# Altium PCB VA_NodeV1.2.PcbDoc (part 4 of 4)
Units mil, origin at the board's own origin, x right, y up, seen from the top; angles counter-clockwise.
Board outline 2925 x 2390 mil, 2 copper layers (Top Layer, Bottom Layer), stack 57 mil thick; 152 components, 110 nets, 488 pads, 205 vias.
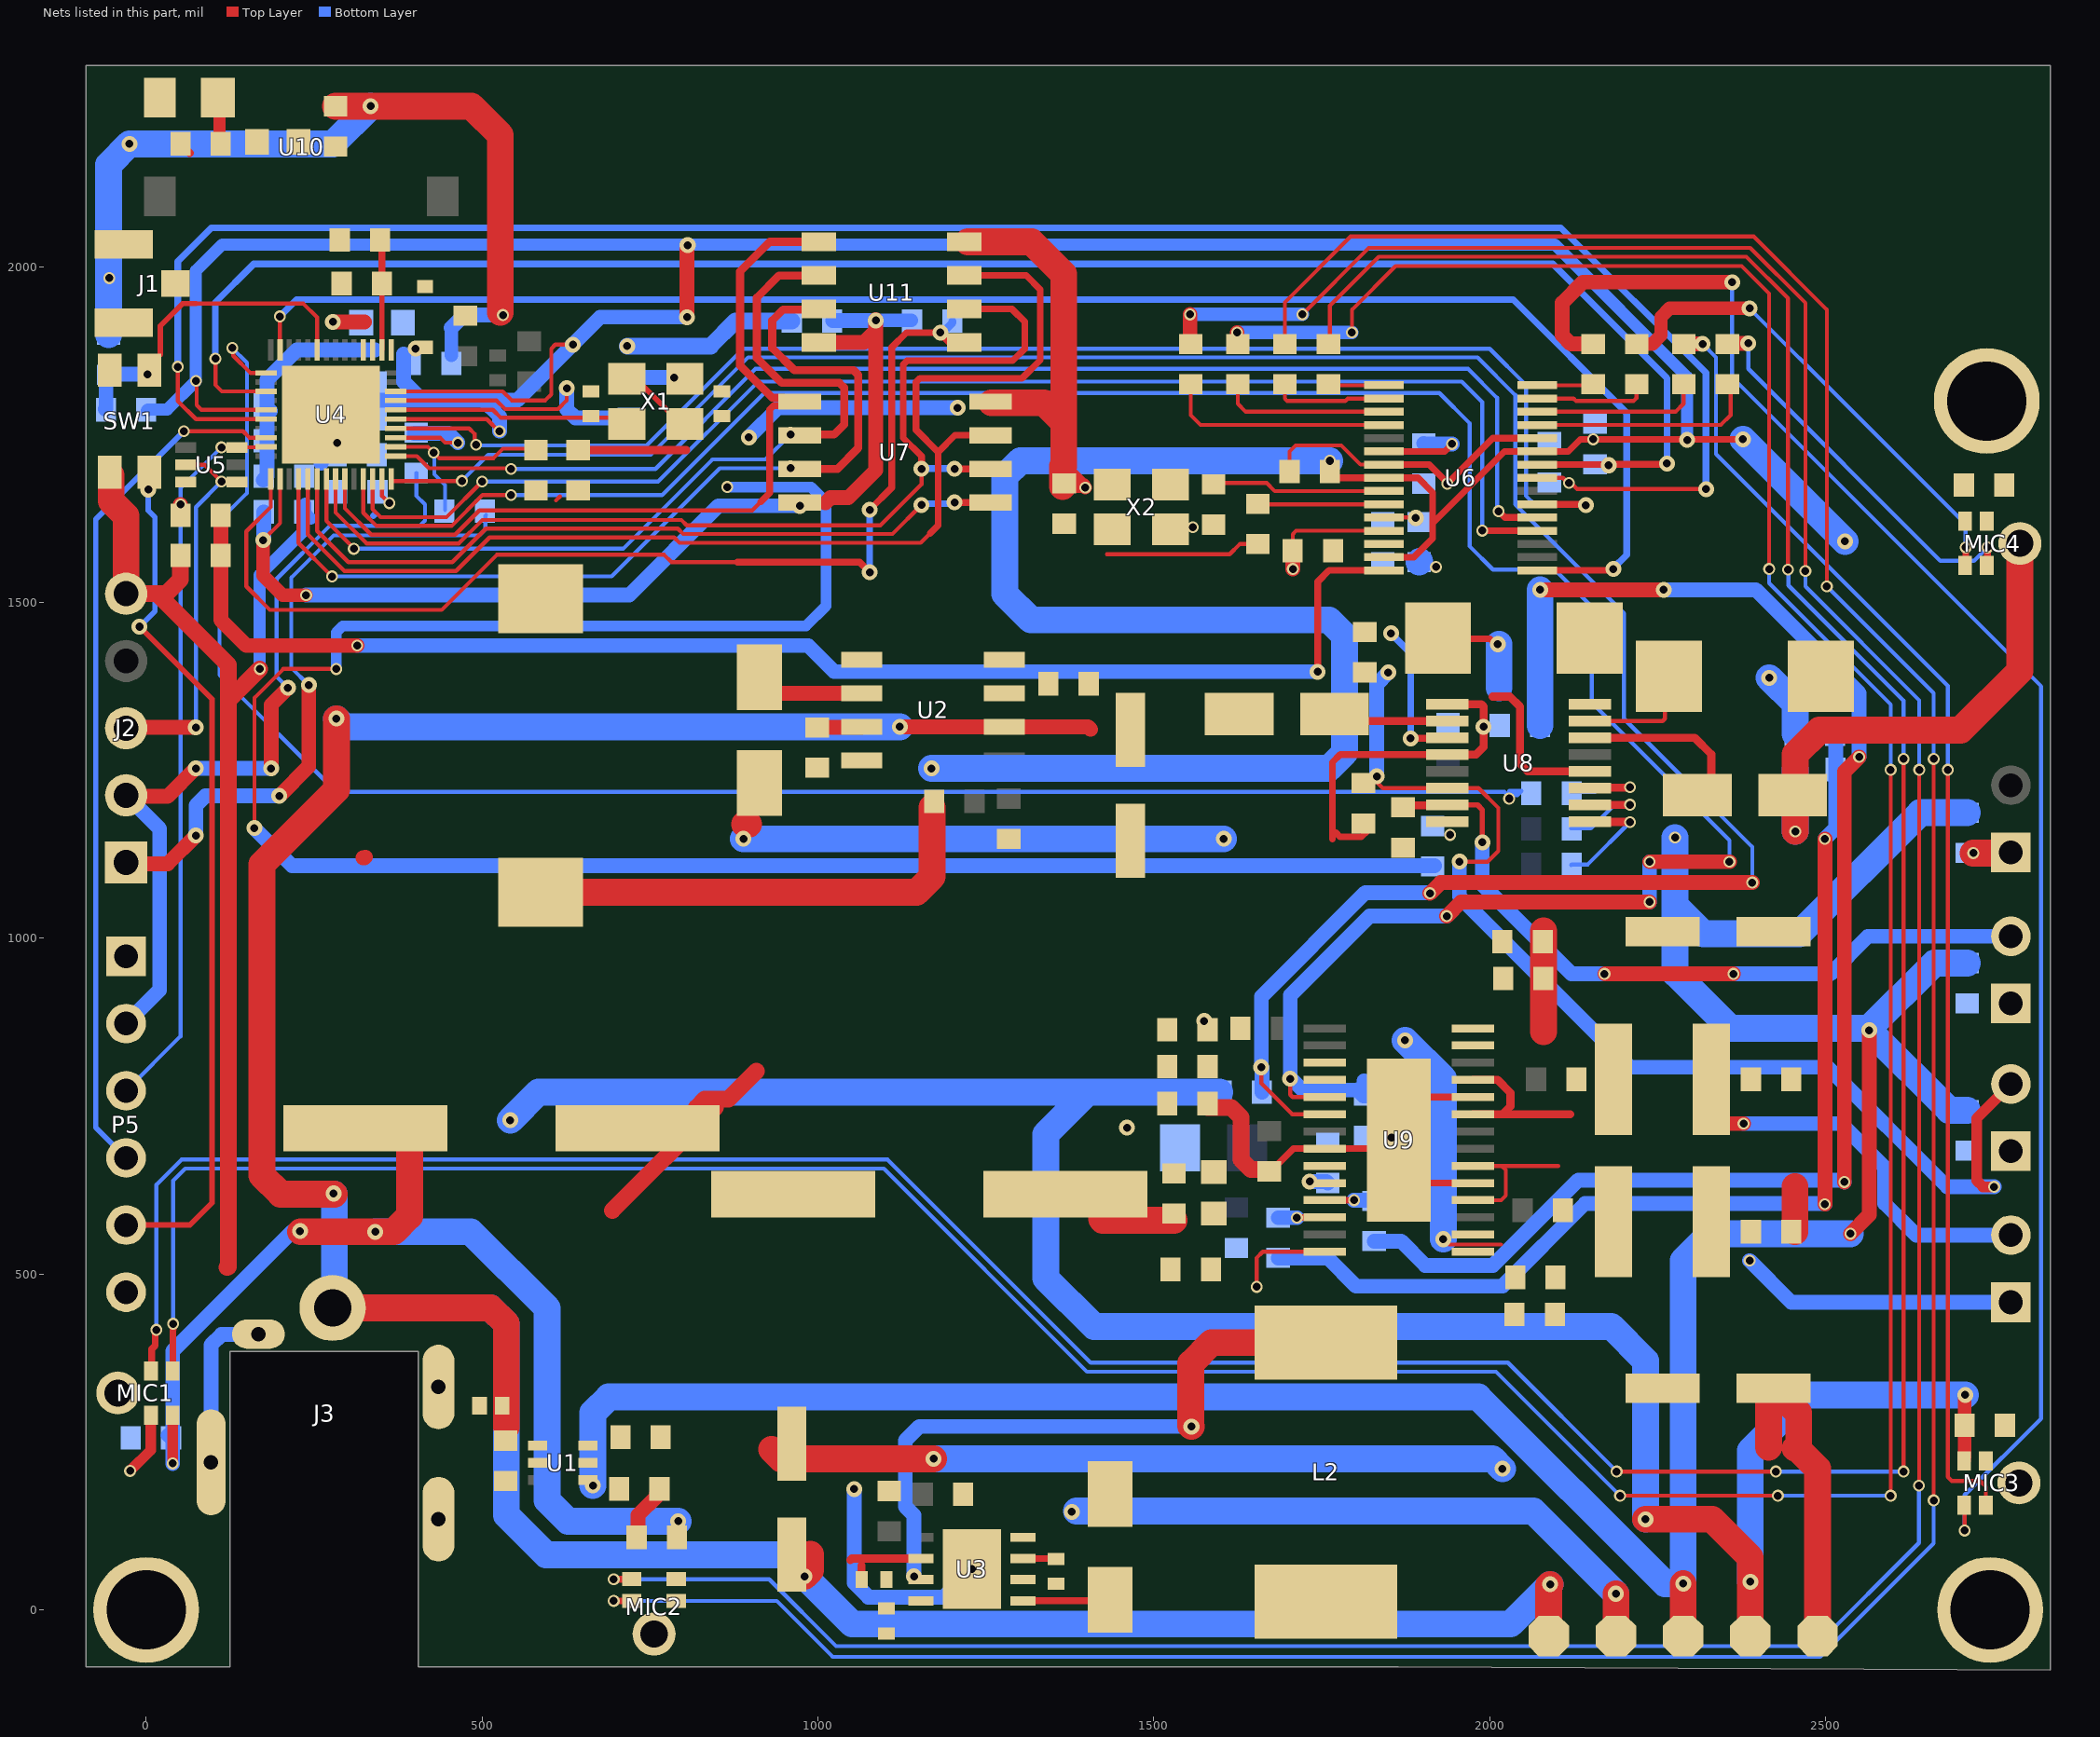
[diagram p2: the nets of this part, all layers, seen from the top]

## Via types
v1: diameter 23.62, hole 11.81, Top Layer to Bottom Layer, tented both sides, 93 vias
v2: diameter 17.72, hole 11.81, Top Layer to Bottom Layer, tented both sides, 81 vias
v3: diameter 17.72, hole 11.81, Top Layer to Bottom Layer, 20 vias
v4: diameter 23.62, hole 11.81, Top Layer to Bottom Layer, 11 vias

## Nets (pads, with @x,y where several pads share a name; then routed paths per layer and width w, separated by ;. In a path a pad name is that pad's centre, name@x,y a point inside that pad or via, vN(x,y) a via of type N, cw(c..) or ccw(c..) an arc to the next point about the centre after c; other vN are vias at no path point) (continued)
ENABLE: C37.1 P5.5 R10.1 SW1.1 U4.9 U5.6 | length 1741.7
  Top Layer w6: SW1.1@4.53,1845.79 4.53,1852.68 SW1.1@21,1869.15 ; 74,1945 85,1945 234,1945 254.33,1924.67 U4.9@254.33,1876.26
  Top Layer w8: P5.5@-30,573 65,573 98,606 98,1356 v1(-10,1464) ; SW1.1@21,1869.15 21,1912 54,1945 74,1945
  Bottom Layer w8: v1(-10,1464) 13,1487 13,1627 3,1637 v1(3,1668)
  Bottom Layer w22: R10.1@-61,1788 -59.94,1789.06 -59.94,1836.06 C37.1@-57,1839 ; C37.1@-48.11,1840 v1(2,1840)
FEED: SB2.1 SB3.1 U4.2 | length 171.7
  Top Layer w8: U4.2@350.79,1876.26 SB2.1@350.79,1975
  Top Layer w10: SB2.1@350.79,1975 SB3.1@350.79,2048
FEED#: C47.1 L6.2 SB3.2
FMT: P2.2 R17.1 U8.15 | length 1098.9
  Top Layer w6: U8.15@1936.29,1198 U8.15@1936.79,1198.5
  Top Layer w8: U8.15@1936.79,1198.5 1981.97,1198.5 1989,1191.47 v1(1989,1143)
  Top Layer w12: R17.1@1869,1198 U8.15@1936.29,1198
  Top Layer w22: v3@2172,947 v3(2363,947)
  Bottom Layer w22: v1(1989,1143) 1989,1080 2122,947 v3(2171,947) ; v3(2363,947) 2507,947 2563,1003 P2.2@2776,1003
GAIN0: R21.1 U4.35 U9.5 | length 3785.5
  Top Layer w6: U4.35@323.23,1683.74 323.23,1633.77 343,1614 454.55,1614 500.55,1660 v2(543,1660) ; v1(1703,791) 1703,767.06 1706.51,763.54 U9.5@1754.53,763.54
  Top Layer w22: v2(1936,1033) 1957,1054 v2(2238,1054) ; v2(2238,1114) v2(2357,1114)
  Bottom Layer w6: v2(543,1660) 768,1660 920,1812 1925,1812 1970,1767 1970,1584 2005,1549 2097,1549 2152,1494 2152,1351 2357,1146 v2(2357,1114)
  Bottom Layer w22: R21.1@1808.5,774.92 1808.5,769 1812.5,765 R21.1@1815,765 ; 1813,787.81 1813,782 1805,774 1721.44,774 1704.75,790.69 1703.31,790.69 v1(1703,791) 1703,915 1821,1033 v2(1936,1033) ; v2(2238,1054) v2(2238,1114)
GAIN1: R22.1 U4.38 U9.6 | length 3727.7
  Top Layer w6: U4.38@364.57,1683.74 364.57,1681.94 365.5,1681 v2(470,1681) ; v1(1660,808) 1660,784 1706.05,737.95 U9.6@1754.53,737.95
  Top Layer w22: v2(1911,1067) 1927,1083 v3(2391,1083)
  Bottom Layer w6: v2(470,1681) 509,1720 751,1720 896,1865 1982,1865 2038,1809 2038,1646 2200,1484 2200,1327 2391,1136 v3(2391,1083)
  Bottom Layer w22: v1(1660,808) 1660,913.01 1814.99,1068 v2@1911,1068 ; R22.1@1661,771 v1@1661,807
GND: C1.2 C2.2 C3.2 C4.2 C5.1 C6.2 C7.2 C8.1 C9.2 C10.2 C11.2 C12.2 C13.2 C14.1 C15.1 C16.2 C17.2 C18.2 C19.2 C21.2 C22.2 C23.2 C32.1 C33.1 C34.1 C35.1 C36.2 C37.2 C39.2 C40.2 C43.1 C44.1 C45.1 C46.1 C47.2 C48.2 C49.2 C50.2 C51.2 C52.2 C53.2 C54.2 C55.2 C56.2 C57.2 C58.2 C59.2 C61.2 C62.2 C65.2 C66.2 D1.2 D3.2 D4.2 J1.2 J1.3 J2.5 J3.2 J3.3 J3.4 J3.5 MIC1.3 MIC1.4 MIC2.3 MIC2.4 MIC3.3 MIC3.4 MIC4.3 MIC4.4 P5.6 P10.1 pad.MH1 pad.MH2 pad.MH3 R1.1 R4.1 R8.1 R15.2 R16.2 R17.2 R21.2 R34.1 SB8.2 SB9.2 SW1.2 U1.2 U1.5 U2.4 U3.2 U3.4 U3.9 U4.49 U6.7 U6.12 U6.26 U7.4 U8.4 U8.9 U8.12 U9.3 U9.4 U9.8 U9.19 U9.24 U9.29 U10.1 U11.4 X1.2 X1.4 X2.2 X2.4 | length 11004.1
  Top Layer w6: X1.2@715.39,1832.93 cw(c715.39,1799.89) X1.2@738.75,1823.25 ; X1.4@791.77,1770.23 ccw(c802,1780.49) X1.4@802,1766 ; C22.2@1702,1695 1702,1725 1711,1734 1779,1734 1807.64,1705.36 1842.62,1705.36 U6.7@1842.66,1705.31 ; C23.2@1706.83,1577 1706.83,1601.83 1711.89,1606.89 U6.12@1842.66,1606.89 ; R16.2@1814.49,1174.49 R16.2@1815,1175 ; v2(1937,1677) v2@1937.63,1677.63
  Top Layer w8: X1.2@738.75,1823.25 X1.4@791.76,1770.24
  Top Layer w10: C66.2@1672,653 1674.5,653 1684.5,663 1684.5,663.24 1708.03,686.77 U9.8@1754.53,686.77 U9.29@1851.97,686.77 ; 1766,1147.86 1766,1262 1777.5,1273.5 U8.12@1936.79,1273.5 ; 1771,1156.86 1776.86,1151 1809,1151 R16.2@1818.5,1160.5 ; U6.7@1842.66,1705.31 1909.95,1705.31 1937.63,1677.63 2004.68,1744.68 U6.26@2071,1744.68 ; U9.29@1864.76,699.57 1864.76,677.83 1907.01,635.59 U9.19@1975,635.59 ; U9.29@1864.76,703 1864.76,721.3 1907.01,763.54 U9.24@1975,763.54
  Top Layer w12: C46.1@51,2183 C46.1@64.61,2169.39 ; SB9.2@643,1727 804,1727 ; U8.12@1936.79,1273.5 1979.5,1273.5 1991,1285 v1(1991,1315) 1991,1345 1987.5,1348.5 U8.9@1936.79,1348.5 ; 2004,1360 2030,1360 2045,1345 2045,1260 2056.5,1248.5 U8.4@2149.39,1248.5
  Top Layer w16: v3(-24,207) 7,238 MIC1.4@7,290
  Top Layer w20: 1366,1703 1395,1674 v2(1398,1671)
  Top Layer w22: v2@527,1932 v2(531,1928) ; C49.2@730,108 732.08,110.08 732.08,141.08 760,169 760,173.5 760.31,173.81 C2.2@762.81,173.81 ; C33.1@1369.93,1674 v2@1395,1674 ; C23.2@1706.83,1577 1707,1576.83 v2(1707,1550)
  Top Layer w25: J2.5@-30,1513 16,1513 ; SB8.2@51,1570 51,1534 30,1513 16,1513 ; 120,510 121,510 122,511 122,1354 ; v2(169,1401) 122,1354 ; 694.14,595 C4.2@847.2,748.05 ; C4.2@819.2,748.05 831.47,760.33 866.83,760.33 908.5,802 ; C54.2@1580,748 1582.32,748 1582.5,747.82 1615.36,747.82 1630,733.18 1630,670.14 1644.64,655.5 1669.5,655.5 C66.2@1672,653 ; 16,1513 122,1407 122,1354
  Top Layer w40: SW1.2@-52.24,1689.61 -52.24,1651.24 -30,1629 J2.5@-30,1513 ; C47.2@282,2239 484,2239 527,2196 v2@527,1932 ; 891,1170 897,1170 ; 931,239 945,225 v1(1172,225) ; U11.4@1223.34,2037 1318,2037 1366,1989 1366,1770 1366,1703 ; U7.4@1258.4,1797.4 1336.6,1797.4 1364,1770 ; C33.1@1364,1672.83 1364,1703 ; U9.29@1838,672.8 1851.97,686.77 U9.29@1864.76,699.57 ; 2415.5,242 C57.2@2415.5,331.5 ; C57.2@2422.68,330 2459,293.68 ; C43.1@2454.5,563 2454.5,630.5 ; 2455,240.5 2458.14,240.5 2488,210.64 P10.1@2488,-39 ; v2(2455,1159) 2455,1274 2491,1310 2701,1310 2789.29,1398.29 MIC4.3@2789.29,1587.97 ; 2460,240.5 2460,293.68
  Bottom Layer w18: v2(169,1401) 169,1541 234,1606 234,1623 235,1624 C19.2@235,1635 C19.2@245,1625 ; C19.2@237,1635 C19.2@237,1647 ; C9.2@283.23,1723.81 C9.2@284,1723.04
  Bottom Layer w20: C12.2@454,1868 454,1909
  Bottom Layer w22: J3.2@96.42,219.65 96.42,394.42 111.96,409.96 J3.3@166.38,409.96 ; 260.25,1707.25 260.25,1717.25 C9.2@278.5,1735.5 ; C9.2@283.5,1735.5 286,1733 286,1736 v1(284,1738) ; 454,1909 473,1928 v2(531,1928) ; v4(897,1746) 941,1790 v4(1208,1790) ; v1(1054,180) 1054,40 1075,19 1187.46,19 v1(1229.21,60.75)
  Bottom Layer w25: v1(716,1882) 840,1882 877,1919 R34.1@961,1919
  Bottom Layer w40: C37.2@-56,1899 v2@-56,1981 ; v2@-56,1983 -56,2152 v1(-25,2183) 278,2183 v1(334,2239) ; J3.3@166.38,409.96 J3.3@167.01,410.59 ; v1(889,1148) v1(1604,1148) ; v1(1172,225) 2004,225 v1(2019,210) ; C35.1@1895,1560 C35.1@1896,1561 ; v2(2455,1159) C61.2@2455,1251.5
  other v1: 1854,703 1575,877
  other v2: 1920,1553 1558,1612 -55,1983
GPIO16: R35.2 U4.25 U11.1 | length 1658.1
  Top Layer w6: U4.25@185.43,1683.74 185.43,1642.43 149,1606 149,1524 184,1489 439.86,1489 521.86,1571 771,1571 782,1560 880,1560
  Top Layer w10: 880,1560 1062,1560 v1(1077,1545) ; v1(1077,1638) 1110,1671 1110,1880.05 1131.81,1901.86 v1(1182.22,1901.86)
  Top Layer w12: v1(1182.22,1901.86) 1197.08,1887 U11.1@1215.78,1887
  Bottom Layer w10: v1(1077,1545) v1(1077,1638)
  Bottom Layer w12: v1(1182.22,1901.86) 1185.36,1901.86 1200,1916.5 R35.2@1200,1919
INTA: U4.42 U6.21 | length 2117.2
  Top Layer w6: U4.42@371.26,1759.33 480.67,1759.33 488.76,1751.24 488.76,1737.24 v2(491,1735)
  Top Layer w10: U6.21@2071,1646.26 v1@2145,1646.26
  Bottom Layer w6: v2(491,1735) 492,1734 745,1734 889,1878 2000,1878 2054,1824 2054,1659 2068,1645 v1(2143,1645)
INTB: U4.39 U6.20 | length 1958.4
  Top Layer w6: U4.39@371.26,1717.99 402.93,1717.99 420.93,1700 v2@541,1700 ; U6.20@2070.91,1626.48 U6.20@2071,1626.57
  Top Layer w10: v2(2013.09,1636) 2022.51,1626.57 2070.81,1626.57 U6.20@2070.91,1626.48
  Bottom Layer w6: v2@541,1699 758,1699 907,1848 1967.81,1848 2011,1804.81 2011,1638.09 v2(2013.09,1636)
  other v2: 543,1699
INTC: U4.36 U6.19 | length 2071.6
  Top Layer w6: U4.36@337.01,1683.74 337.01,1641.01 336.98,1639.02 349,1627 447,1627 v2(500,1680)
  Top Layer w10: v2(1989,1607) 1989.06,1606.94 2070.95,1606.94 U6.19@2071,1606.89
  Bottom Layer w6: v2(500,1680) 762,1680 911,1829 1958.53,1829 1989,1798.53 v2(1989,1607)
IO_0: P5.3 SB7.2 U4.23 U5.3 | length 1100.2
  Top Layer w6: v2(112,1731) 112.2,1730.8 137.98,1730.8 138.19,1730.59 138.78,1731.18 178.15,1731.18 U4.23@178.74,1731.77
  Top Layer w22: SB7.2@51,1630 v2(51,1646)
  Bottom Layer w6: P5.3@-30,773 51,854 51,1670 v2(112,1731)
IO_2: P5.4 U4.22 | length 1281.6
  Top Layer w6: v2(56,1755) 144,1755 153.45,1745.55 U4.22@178.74,1745.55
  Bottom Layer w8: P5.4@-30,673 -75,718 -75,1624 v2(56,1755)
"IPK SNS": R2.1 U2.1 U2.7 U2.8
"IPK SNS#": L2.2 R5.1 R7.1 U3.7 | length 944.4
  Top Layer w40: v1(1556,273) 1555,274 1555,367 1585.91,397.91 L2.2@1750,397.91
  Bottom Layer w22: v1(1143,50) 1143,140.72 1130,153.72 1130,252.11 1150.89,273 v1(1556,273)
LRCK_DAC: R25.2 U4.15 | length 2631.1
  Top Layer w6: v2(128,1879) 129.63,1877.37 129.63,1867.37 154.99,1842.01 U4.15@178.74,1842.01
  Bottom Layer w6: v2(128,1879) 150,1857 150,1663 109,1622 109,1392 283,1218 2022,1218 v2@2029,1211 ; v2(2029,1208) v2@2029,1211 ; v2@2029,1211 v2@2029,1213 ; v2@2029,1213 2041.38,1213 2047.63,1219.25 2029,1219.25 v2@2029,1213
LRCKA: U4.13 U6.16 | length 2489.3
  Top Layer w6: v2(199,1926) 199.11,1925.89 199.11,1876.37 U4.13@199.15,1876.32
  Top Layer w10: U6.16@2071,1547.83 2181.83,1547.83 v1(2184,1550)
  Bottom Layer w10: v2(199,1926) 224,1951 2035,1951 2204,1782 2204,1570.99 2184,1550.99 v1(2184,1550)
MUTE: P3.2 R16.1 SB1.1 U8.14 | length 1741.1
  Top Layer w6: R16.1@1810,1235 R16.1@1811,1236 ; R16.1@1811,1227 R16.1@1816.25,1232.25 ; R16.1@1816,1232.5 1818.5,1235 1832,1235 v1(1832,1241) ; v1@1832,1232.5 1841,1223.5 U8.14@1936.79,1223.5 1983.5,1223.5 2013,1194 2013,1130 1997,1114 v1(1955,1114)
  Top Layer w16: v3(2751,630) 2734.37,630 2725,639.37 2725,732 P3.2@2776,783
  Bottom Layer w22: v1(1832,1241) 1832,1378.56 1849,1395.56 v1(1849,1396) ; v1(1955,1114) 1955,1062 2209,808 2503,808 2681,630 v3(2751,630)
NetC5_2: C5.2 U2.3 | length 67.2
  Top Layer w22: C5.2@999,1312 1001.19,1314.19 1064.19,1314.19 U2.3@1065,1315
NetC8_2: C8.2 U3.3 | length 50.6
  Top Layer w6: C8.2@1353.5,76.5 C8.2@1355,75
  Top Layer w10: U3.3@1305,76.5 C8.2@1353.5,76.5
NetC24_2: C24.2 U6.1 | length 83.3
  Top Layer w6: C24.2@1760,1825 1761.58,1823.42 U6.1@1842.66,1823.42
NetC25_2: C25.2 U6.2 | length 172.1
  Top Layer w6: C25.2@1695,1825 1695,1803.51 1698.51,1800 1785,1800 1788.74,1803.74 U6.2@1842.66,1803.74
NetC26_2: C26.2 U6.3 | length 251.6
  Top Layer w6: C26.2@1625,1825 1625,1796 1636.95,1784.05 U6.3@1842.66,1784.05
NetC27_2: C27.2 U6.4 | length 339.7
  Top Layer w6: C27.2@1555,1825 1555,1779 1569.63,1764.37 U6.4@1842.66,1764.37
NetC28_2: C28.2 U6.27 | length 339.7
  Top Layer w6: U6.27@2071,1764.37 2344.03,1764.37 2358.66,1779 C28.2@2358.66,1825
NetC29_2: C29.2 U6.28 | length 251.6
  Top Layer w6: U6.28@2071,1784.05 2276.71,1784.05 2288.66,1796 C29.2@2288.66,1825
NetC30_2: C30.2 U6.29 | length 171.5
  Top Layer w6: U6.29@2071,1803.74 2124.92,1803.74 2128.66,1800 2214,1800 2218.51,1804.51 2218.51,1824.85 C30.2@2218.66,1825
NetC31_2: C31.2 U6.30 | length 83.3
  Top Layer w6: U6.30@2071,1823.42 2152.08,1823.42 C31.2@2153.66,1825
NetC32_2: C32.2 C35.2 U6.11 | length 47.6
  Top Layer w6: U6.11@1842.66,1626.57 1889.43,1626.57 v1(1890,1626)
NetC33_2: C33.2 R13.1 X2.1 | length 231.2
  Top Layer w6: 1430,1572 1613,1572 1628,1587 R13.1@1655,1587
NetC36_1: C36.1 U6.6 | length 148.3
  Top Layer w10: U6.6@1842.66,1725 1933,1725 v2(1944,1736)
  Bottom Layer w22: C36.1@1902,1737 1903,1736 v2(1944,1736)
NetC38_2: C38.2 U8.7 | length 171.1
  Top Layer w6: U8.7@2149.39,1323.5 2257.49,1323.5 2261,1327.01 C38.2@2261,1385
NetC40_1: C40.1 U8.10 | length 172
  Top Layer w6: C40.1@1741.87,1334 C40.1@1744.37,1331.5
  Top Layer w12: C40.1@1768.37,1323.5 U8.10@1936.79,1323.5
NetC46_2: C46.2 L6.1 U10.2 | length 69.2
  Top Layer w18: U10.2@108.81,2243.91 108.81,2185.19 C46.2@111,2183 ; U10.2@108.81,2249.81 U10.2@114,2255
NetC60_2: C60.2 U8.8 | length 5.9
  Top Layer w10: C60.2@2105,1444 C60.2@2109.18,1439.82
NetC63_2: C63.2 U9.11 | length 73.9
  Top Layer w10: U9.11@1754.53,610 v2(1798,610)
  Bottom Layer w22: v2(1798,610) 1827,610 C63.2@1828,609
NetC64_2: C64.2 U9.12 | length 69.7
  Top Layer w6: v2(1713,584) v2@1713.41,584.41
  Top Layer w10: v2@1713.41,584.41 U9.12@1754.53,584.41
  Bottom Layer w22: C64.2@1685,584 v2(1713,584)
NetD1_1: D1.1 L1.1 U2.2 | length 174.8
  Top Layer w22: D1.1@900,1388.74 923.74,1365 U2.2@1065,1365
NetD2_2: D2.2 L2.1 U3.1 | length 130.6
  Top Layer w6: D2.2@1433.5,13.5 D2.2@1435,15
  Top Layer w10: U3.1@1305,13.5 D2.2@1433.5,13.5
NetJ1_1: J1.1 SB2.2
NetL7_1: L7.1 SB5.2
NetP1_1: P1.1 R14.1 | length 56.4
  Top Layer w40: v2(2720,1127) 2775,1127 P1.1@2776,1128
NetP2_1: P2.1 R18.1
NetP3_1: P3.1 R19.1
NetR5_2: R5.2 U3.8
NetR9_2: R9.2 U4.45 | length 412.8
  Top Layer w6: U4.45@371.26,1800.67 521.67,1800.67 534.34,1788 613,1788 626,1801 v1(626,1819)
  Bottom Layer w22: v1(626,1819) 626,1787.89 638.89,1775 R9.2@719,1775
NetR11_2: R11.2 U4.41 | length 166.7
  Top Layer w6: U4.41@371.26,1745.55 437.45,1745.55 445,1738 v2(464,1738)
  Bottom Layer w22: R11.2@399,1752 450,1752 v2(464,1738)
NetR23_1: R23.1 U8.1 | length 175.3
  Top Layer w12: U8.1@2149.39,1173.5 2149.64,1173.25 2209.75,1173.25 v2@2210,1173
  Bottom Layer w6: R23.1@2121,1109 R23.1@2122,1110 2145.99,1109.99 v2(2209,1173)
NetR24_1: R24.1 U8.2 | length 164.4
  Top Layer w6: U8.2@2149.39,1198.5 U8.2@2149.64,1198.25
  Top Layer w12: U8.2@2149.64,1198.25 2150.07,1198.69 2209.69,1198.69 v2@2209.88,1198.88
  Bottom Layer w6: R24.1@2121,1163.5 2150.5,1163.5 2185.88,1198.88 v2@2209.88,1198.88
  other v2: 2209,1198.88
NetR25_1: R25.1 U8.3 | length 151.3
  Top Layer w6: U8.3@2149.39,1223.5 U8.3@2149.64,1223.25
  Top Layer w12: U8.3@2149.64,1223.25 2150.64,1224.25 2208.25,1224.25 v2(2209,1225)
  Bottom Layer w6: R25.1@2121,1218 2157,1218 2164,1225 v2(2209,1225)
NetR26_1: R26.1 U8.16
  other v2: 1941,1154
NetR30_1: R30.1 U9.14 | length 148.3
  Top Layer w6: v2(1653,481) 1653,524 1662.23,533.23 U9.14@1754.53,533.23
NetR31_2: R31.2 SB6.1 U4.40 | length 311.9
  Top Layer w6: U4.40@371.26,1731.77 419.23,1731.77 v2(428,1723) 436,1715 517,1715 531,1729 578,1729 SB6.1@580,1727
  Bottom Layer w6: v2@429,1721 429,1691 445,1675 R31.2@445,1638
OUT1_N: C24.1 MIC1.2 | length 5702.4
  Top Layer w6: C24.1@1762.08,1885 1762.08,1942.08 1835,2015 2382,2015 2444,1953 v2(2444,1549) ; v3(2189,206) v3(2426,206) ; v3(2616,206) v3@2616,1266
  Top Layer w10: MIC1.2@7,355.94 8,356.94 8,388.14 13.52,393.66 13.52,415.52 v2(15,417)
  Bottom Layer w6: v2(15,417) 15,633 52.43,670.43 1103.56,670.43 1406,368 2027,368 v3(2189,206) ; v3(2426,206) v3(2616,206) ; v2(2444,1549) 2444.67,1548.33 2444.67,1525.33 2616,1354 v3@2616,1266
  other v3: 2616,1267
OUT1_P: C26.1 MIC1.1 | length 5793.8
  Top Layer w6: v2(1795,1902) 1795,1936 1860,2001 2375,2001 2416,1960 v2(2416,1550) ; v3(2194,170) v3(2429,170) ; v3(2597,170) v3@2597,1248
  Top Layer w10: MIC1.1@39.36,355.94 39.68,356.26 39.68,417.68 v2@40,418
  Top Layer w22: v2(1624,1902) 1624,1886 C26.1@1625,1885
  Bottom Layer w6: v2(40,426) 40,639 58,657 1098,657 1400.44,354.57 2009.44,354.57 v3(2194,170) ; v2(2416,1550) 2416,1529 2597,1348 v3(2597,1251) v3@2597,1248 ; v3(2429,170) v3(2597,170)
  Bottom Layer w20: v2(1624,1902) v2(1795,1902)
OUT2_N: C25.1 MIC2.2 | length 4953.3
  Top Layer w6: C25.1@1695,1885 1695,1947 1793,2045 2393,2045 2502,1936 v2(2502,1524) ; v3(2661,163) v3@2661,1266
  Top Layer w10: v2(696.03,13.29) MIC2.2@723.03,13.29
  Top Layer w22: C25.1@1698.58,1883.42 C25.1@1700.15,1885
  Bottom Layer w6: v2(696.03,13.29) 938.71,13.29 1022,-70 2492,-70 2661,99 v3(2661,163) ; v2(2502,1524) 2661,1365 v3@2661,1269
  other v3: 2661,1267
OUT2_P: C27.1 MIC2.1 | length 5027.1
  Top Layer w6: v2(1721,1929) 1820,2028 2388,2028 2470,1946 v2(2470,1547) ; v3(2639,185) 2639.5,185.5 v3@2639.5,1248
  Top Layer w10: v2(696.03,45.65) MIC2.1@723.03,45.65
  Top Layer w22: v2(1554,1929) 1554,1886 C27.1@1555,1885
  Bottom Layer w6: v2(696.03,45.65) 927.35,45.65 1027,-54 2485.37,-54 2639,99.63 v3(2639,185) ; v2(2470,1547) 2470,1524 2639.5,1354.5 v3@2639.5,1248
  Bottom Layer w20: v2(1554,1929) v2(1721,1929)
  other v3: 2639.5,1251
OUT3_N: C29.1 MIC3.2 | length 1954.3
  Top Layer w6: v3(2682,1251) 2682,198 2688,192 2730,192 2738.71,183.29 MIC3.2@2738.71,156.03
  Top Layer w22: C29.1@2291,1885 v1(2317,1885)
  Bottom Layer w6: v1(2317,1885) 2337,1865 2337,1721 2682,1376 v3(2682,1251)
OUT3_P: C31.1 MIC3.1 | length 2499.9
  Top Layer w6: MIC3.1@2706.35,156.03 2707,155.37 v3(2707,118.2)
  Top Layer w22: C31.1@2154,1885 2120.89,1885 2108,1897.89 2108,1946 2139,1977 v1(2361,1977)
  Bottom Layer w6: v1(2361,1977) 2361,1835 2821,1375 2821,285 2707,171 v3(2707,118.2)
OUT4_N: C28.1 MIC4.2 | length 579.2
  Top Layer w10: MIC4.2@2741,1555 v2(2741,1582)
  Top Layer w22: C28.1@2354,1885 2355,1886 v1(2385,1886)
  Bottom Layer w6: v1(2385,1886) 2385,1848 2671,1562 2721,1562 v2(2741,1582)
OUT4_P: C30.1 MIC4.1 | length 722.1
  Top Layer w10: MIC4.1@2708.64,1555 v2(2708.64,1582)
  Top Layer w20: C30.1@2219,1885 2242.11,1885 2255,1897.89 2255,1925.11 2267.89,1938 v1(2387,1938)
  Bottom Layer w6: v1(2387,1938) 2534,1791 2708.64,1616.36 v2(2708.64,1582)
OUT_EN: R1.2 U1.3
OUTN: C42.1 L5.1 U9.23 U9.25 | length 247.3
  Top Layer w6: 2114.05,737.95 2115,737
  Top Layer w12: U9.23@1975,737.95 2019.02,737.95 ; U9.25@1975,789.13 2011.87,789.13 2031,770 2031,750 2019.02,738.02 2019.02,737.95 ; 2120.05,737.95 2019.02,737.95
OUTP: C41.1 L4.1 U9.18 U9.20 | length 225.5
  Top Layer w6: U9.18@1975,610 2017,610 2024,617 2024,655 2018,661 ; U9.20@1975,661.18 1975.18,661 2018,661 ; 2102,661 2018,661
PLIMIT: C44.2 U9.9 U9.10 | length 28
  Bottom Layer w22: v1(1732,638) 1732.31,637.69 1756.9,637.69 C44.2@1759,635.59
RTS: J2.3 U5.1 U5.5 | length 571.7
  Top Layer w6: U5.5@61.81,1705 87,1705 v2(111.96,1680.04) 137.55,1680.04 U5.1@138.19,1679.41
  Top Layer w22: J2.3@-29,1314 v1(74,1314)
  Bottom Layer w6: v1(74,1314) 74,1642.09 v2(111.96,1680.04)
RX: J2.1 P5.1 R31.1 | length 990.8
  Top Layer w22: J2.1@-30,1113 -28,1111 32,1111 v1(74,1153) ; v1(198,1212) 242,1256 v1(242,1377)
  Bottom Layer w6: v1(242,1377) 216,1403 216,1537 279,1600 496,1600 505,1609 505,1613 505.01,1629.01 R31.1@506,1630
  Bottom Layer w22: v1@74,1153.44 74,1198 88,1212 v1(198,1212)
SCK/CLK: U4.31 U7.6 U11.6 | length 1327.8
  Top Layer w6: U4.31@268.11,1683.74 268.11,1621.89 v2@310,1580
  Top Layer w12: v1(959,1750) 1024,1750 1039,1765 1039,1819.97 1031.97,1827 946,1827 909,1864 909,1954 942,1987 U11.6@1003.19,1987
  Bottom Layer w6: v2@310,1580 710,1580 843,1713 922,1713 v1(959,1750)
  other v2: 309,1580
SCK_DAC: R26.2 SB6.2 SB9.1 | length 3233.3
  Top Layer w6: v1(161,1164) 161,1358 204,1401 v2(283,1401) ; 610,1652 616,1658
  Bottom Layer w16: v2(283,1401) 283,1455.63 292.37,1465 982,1465 1012,1495 1012,1650 990,1672 v2(865,1672)
  Bottom Layer w22: v1(161,1164) 217,1108 R26.2@1917.8,1108
SCKA: SB7.1 SB8.1 U6.15 | length 2057.5
  Top Layer w10: v1(1744,1397) 1744,1531 1760.83,1547.83 U6.15@1842.66,1547.83
  Top Layer w22: SB7.1@111,1627 111,1566 111,1474 149,1436 v2(314,1436)
  Bottom Layer w22: v2(314,1436) 985.28,1436 1024.28,1397 v1(1744,1397)
SCL: R33.1 U4.17 U6.24 | length 2779.8
  Top Layer w6: v2(103,1863) 103,1824 112.55,1814.45 U4.17@178.74,1814.45
  Top Layer w10: U6.24@2071,1705.31 2176.09,1705.31 2177.7,1703.7 2179.7,1705.7 2262.7,1705.7 v1(2264,1707)
  Bottom Layer w10: v2(103,1863) 103,1947 160,2004 2094,2004 2264,1834 v1(2264,1707)
  other v1: 2177,1704.41
SCS/CMD: U4.30 U7.1 | length 1142.7
  Top Layer w6: U4.30@254.33,1683.74 254.33,1641.67 254.33,1606.67 301,1560 455.7,1560 505.7,1610 791.35,1610 799.35,1602 1110.85,1602 v1(1154.17,1645.33)
  Top Layer w10: v1(1203.25,1649) U7.1@1256.8,1649
  Top Layer w22: U7.1@1256.8,1649 U7.1@1257.13,1649
  Bottom Layer w10: v1(1154.17,1645.33) 1156.01,1647.16 1201.42,1647.16 v1(1203.25,1649)
SDA: R32.1 U4.20 U6.23 | length 3167
  Top Layer w6: v2(47,1851) 47,1800 73.94,1773.06 U4.20@178.74,1773.11 U4.20@178.74,1773.11 ; U6.23@2071,1685.63 2109.07,1685.63 2116.7,1678 2121.17,1678 2130.17,1669 v1(2322,1669)
  Bottom Layer w10: v2(47,1851) 47,2008 97,2058 2106,2058 2322,1842 v1(2322,1669)
  other v2: 2118,1678
SDI/SD1: U4.33 U7.5 U11.5 | length 1280.5
  Top Layer w6: U4.33@295.67,1683.74 295.67,1640.33 335,1601 459.93,1601 495.93,1637 902,1637 915,1650
  Top Layer w10: 915,1650 928,1663 928,1787.32 933.86,1793.17 949.17,1793.17 955,1799 U7.5@972.94,1799
  Top Layer w12: U7.5@972.94,1799 955,1799 948.99,1805.01 931.99,1805.01 884,1853 884,1993 928,2037 U11.5@1003.19,2037
SDO/SD0: U4.32 U7.2 U11.2 | length 1607.3
  Top Layer w6: U4.32@281.89,1683.74 281.89,1634.11 328,1588 465.32,1588 500.32,1623 796.73,1623 804.73,1615 1093,1615 1154.17,1676.17 v1(1154.17,1699)
  Top Layer w10: v1(1154.17,1699) 1154.17,1717.83 1127,1745 1127,1854.14 1132.86,1860 1290,1860 1308,1878 1308,1918 1289,1937 U11.2@1215.78,1937 ; v1(1203.25,1699) U7.2@1256.8,1699
  Top Layer w22: U7.2@1256.8,1699 U7.2@1257.13,1699
  Bottom Layer w10: v1@1154.17,1699.5 v1@1203.25,1699.5
SHD/SD2: U4.28 U7.7 U11.7 | length 1399.8
  Top Layer w6: U4.28@226.77,1683.74 226.77,1588.56 v2(276.47,1538.86)
  Top Layer w12: v1(959,1700) 960,1699 1029,1699 1060,1730 1060,1838.97 1052.97,1846 965,1846 932,1879 932,1920 948,1936 1000.22,1936 U11.7@1001.22,1937
  Bottom Layer w6: v2(276.47,1538.86) 692.86,1538.86 854,1700 v1(959,1700)
SPKN: C45.2 L5.2 P4.2 | length 633.7
  Top Layer w22: L5.2@2342.17,821 2336.17,815 2336.17,768.23 2346.39,758 2346.39,724 v2(2378,724)
  Bottom Layer w22: v2(2378,724) 2523,724 2588,659 2588,605 2635,558 P4.2@2776,558
SPKP: C43.2 L4.2 P4.1 | length 414.7
  Bottom Layer w22: v2(2387,520) 2449,458 P4.1@2776,458
SWP/SD3: U4.29 U7.3 U11.3 | length 1820.6
  Top Layer w6: U4.29@240.55,1683.74 240.55,1601.45 295,1547 461.09,1547 511.09,1597 785.96,1597 793.96,1589 1153,1589 1167,1603
  Top Layer w10: 1167,1603 1179,1615 1179,1724 ; U11.3@1215.78,1987 1310,1987 1331,1966 1331,1861 1304,1834 1151.86,1834 1146,1828.14 1146,1757 1179,1724 ; U7.3@1256.8,1749 1204,1749 1179,1724
TX: J2.2 P5.2 R11.1 | length 1248.7
  Top Layer w22: J2.2@-30,1213 -28.31,1211.31 31.69,1211.31 73.69,1253.31 v1(74,1253) ; v1(186,1253) 186,1347.56 211,1372.56 v1(211,1373)
  Bottom Layer w6: v1(211,1373) 210.67,1373 194,1389.67 194,1535 273,1614 407,1614 415,1622 415,1646 402,1659 R11.1@402,1693
  Bottom Layer w22: P5.2@-30,873 20,923 20,1163 J2.2@-30,1213 ; v1(74,1253) v1(186,1253)
VCC#: L3.2 U4.3 U4.4 | length 47
  Top Layer w22: v1(278,1918) 325,1918
VCC_3V3: C4.1 C9.1 C10.1 C11.1 C12.1 C13.1 C16.1 C17.1 C18.1 C22.1 C23.1 C48.1 C49.1 C50.1 C51.1 D3.1 L1.2 L3.1 MIC1.5 MIC2.5 MIC3.5 MIC4.5 P9.1 R3.1 R10.2 R22.2 R32.2 R33.2 U4.1 U4.19 U4.37 U4.43 U4.46 U6.8 U6.13 U6.14 U6.25 | length 13380.4
  Top Layer w6: v2@75,1830 75,1794 82.11,1786.89 U4.19@178.74,1786.89 ; U4.37@350.79,1683.74 350.79,1658.8 361.58,1648 v2(362,1648) ; U4.43@371.26,1773.11 506.89,1773.11 v2@526,1754 ; U4.46@371.26,1814.45 530.55,1814.45 544,1801 594,1801 603,1810 603,1878 609,1884 v1(635,1884)
  Top Layer w10: C22.1@1762,1695 1771.37,1685.63 U6.8@1842.66,1685.63 1893.37,1685.63 1915,1664 1915,1618 ; U6.14@1842.66,1567.52 1887.1,1567.52 1915,1595.41 1915,1618 ; v1(2377,1743) v2(2154,1743) 2135,1743 2117,1725 U6.25@2071,1725 2022,1725 1915,1618
  Top Layer w16: v3(39.36,218.1) MIC1.5@39.36,290
  Top Layer w20: MIC3.5@2706.62,222.63 2706.62,227.12 2707,227.5 C50.1@2707,275 2707,278.02 2707.31,278.33 2707.31,319.31 v4(2708,320)
  Top Layer w22: 323,1120 325,1120 326,1121 ; v4(805,1925) v4@805,2031
  Top Layer w40: v4@230,563 v4(341,563) 368.57,563 392,586.43 392,702.55 377.55,717 C4.1@326.44,717 ; L1.2@550.5,1074.5 556.5,1068.5 L1.2@587,1068.5 1146.57,1068.5 1170,1091.93 R3.1@1170,1195 ; v1(2232,135) 2331,135 2388,78 v4(2388,42) P9.1@2388,-39
  Bottom Layer w10: 338,1629 341,1632
  Bottom Layer w18: R10.2@1,1786 2.46,1787.46 31.46,1787.46 v2(74,1830) 74,1994 113,2033 2097,2033 2294,1836 v1(2294,1742)
  Bottom Layer w22: C48.1@33,260 C48.1@37,256 ; v3(39.36,218.1) 39.36,385.36 217.69,563.69 228.69,563.69 v4(229,564) ; C18.1@174.17,1682.17 180,1688 180,1832 224,1876 341,1876 ; C13.1@184.5,1785.5 C13.1@185,1785 ; 350,1801 405,1801 439.8,1801 ; C12.1@383,1870 383,1829.17 405,1807.17 ; 442,1801 502,1801 ; v2(526,1755) 526,1777 502,1801 ; v4(805,1925) 676,1925 v1(635,1884) 552,1801 502,1801
  Bottom Layer w40: v4(341,563) 483,563 597,449 597,163 628,132 v4(792,132) ; v1(542,729) 584,771 1402,771 ; v1(1169,1253) 1760.57,1253 1784,1276.43 1784,1450.57 1760.57,1474 1317,1474 1278,1513 1278,1687.57 1301.43,1711 v2(1762,1711) ; R22.2@1598,771 1402,771 ; v1(2232,135) 2232,371 2181,422 1411,422 1339,494 1339,708 1402,771 ; v1(2377,1743) v4(2529,1591) ; v4(2388,42) 2388,237 2471,320 v4(2708,320)
  other v1: 401,1878
  other v4: 806,2032
VCC_5V: C1.1 C3.1 C6.1 D4.1 J3.1 P7.1 R2.2 R7.2 U1.4 U2.6 U3.6 | length 5008.4
  Top Layer w12: 1048,74 1050.5,76.5 U3.6@1153.43,76.5 ; R7.2@1065,45 1065,66
  Top Layer w22: v1(1122,1315) U2.6@1277.6,1315 1402,1315 1406,1311
  Top Layer w40: J3.1@277.52,449.57 512.57,449.57 536,426.14 536,272 ; v1@280,619 200,619 172,647 172,1110 283,1221 v1(283,1327) ; v1(980,50) 989,59 989,82.5 ; P7.1@2088,-39 2088,36 v1(2090,38)
  Bottom Layer w40: v1@280,619 280,452.05 J3.1@277.52,449.57 512.57,449.57 536,426.14 536,141 595,82 948,82 v1(980,50) 1051,-21 2031,-21 v1(2090,38) ; v1(283,1327) 295,1315 v1(1122,1315)
  other v1: 279,620
VCC_5V#: C2.1 C39.1 P8.1 R14.2 R18.2 R19.2 U1.1 U8.6 | length 4756.3
  Top Layer w12: U8.6@2149.39,1298.5 2305.5,1298.5 2330.03,1273.97 2330.03,1219.47 2332,1217.5 2308,1193.5 C39.1@2276,1225.5
  Top Layer w22: v2(2537,560) 2565,588 v4(2565,863)
  Top Layer w40: P8.1@2288,-39 v1(2288,39)
  Bottom Layer w40: v1(665,185) 665,293.57 688.43,317 1983,317 2261,39 v1(2288,39) 2288,520 2328,560 v2(2537,560) ; v2(2276,1150) 2276,1049 ; v4(2565,863) 2684,744 R19.2@2711,744 ; R18.2@2711,963 2662,963 2565,866 2358,866 2276,948 2276,1049 ; R14.2@2711,1187 2641,1187 2461,1007 2318,1007 2276,1049
VCC_12V: C7.1 D2.1 P6.1 R6.1 SB4.1 SB5.1 | length 1025.8
  Top Layer w40: 1422,582 1424,580 SB4.1@1530,580 ; P6.1@2188,-39 v1(2188,24)
  Bottom Layer w40: v1@1385,147 2065,147 v1(2188,24)
  other v1: 1378,146
VCC_12V#: C52.1 C53.1 C54.1 C55.1 C56.1 C57.1 C58.1 C59.1 C65.1 L7.2 R20.1 R29.2 SB4.2 U9.15 U9.16 U9.27 U9.28 | length 559.4
  Top Layer w6: v1(1931,552) 1939,544 2016.5,544
  Top Layer w40: 2080,861 C55.1@2080,940 C56.1@2080,1011
  Bottom Layer w6: v1@1459,718 v1(1460,718)
  Bottom Layer w40: v1(1874,848) 1931,791 v1(1931,552)
VDD_SDIO: C19.1 R34.2 R35.1 U4.26 U7.8 U11.8 | length 1589.2
  Top Layer w6: v1(174,1593) 199.21,1618.21 U4.26@199.21,1683.74
  Top Layer w20: v1(174,1593) 174,1540 203,1511 v2(238,1511)
  Top Layer w22: v1(973,1644) U7.8@973.44,1644 ; U11.8@1003.19,1887 1068,1887 1086,1905 ; 1010.99,1648.11 1018.87,1656 1045,1656 1086,1697 1086,1905 ; v1@1086,1921 1086,1905
  Bottom Layer w20: v1(1086,1920) R35.1@1139,1920
  Bottom Layer w22: v1(174,1593) 175,1594 C19.1@175,1635 ; v2(238,1511) 719,1511 852,1644 v1@972.56,1644 ; R34.2@1022,1920 v1(1086,1920)
VOUTL: C61.1 C64.1 R27.1 | length 1589.9
  Top Layer w22: v2(2499,604) v2(2499,1148)
  Bottom Layer w22: C64.1@1685,524 1759,524 1801,482 2019,482 2142,605 2498,605 v2(2499,604) ; v2(2499,1148) 2515,1164 R27.1@2515,1304.5
VOUTL#: C38.1 R27.2 | length 99.7
  Bottom Layer w40: v1(2416,1388) 2455,1349 R27.2@2455,1304.5
VOUTR: C62.1 C63.1 R28.1 | length 2246.7
  Top Layer w22: v1(2075,1519) v1(2259,1519) ; v2(2528,637) 2528,1248 v2(2550,1270)
  Bottom Layer w22: C63.1@1828,549 1868,549 1904,513 2005,513 2132,640 2525,640 v2(2528,637) ; v1(2259,1519) 2396,1519 2550,1365 v2(2550,1270)
  Bottom Layer w40: C62.1@2075,1317 v1(2075,1519)
VOUTR#: C60.1 R28.2 | length 144.8
  Top Layer w10: C60.1@1935.5,1446 2000.31,1446 2008.31,1438 v1(2012,1438)
  Bottom Layer w40: R28.2@2014,1373 v1@2014,1438
XI_A: R13.2 U6.10 | length 189
  Top Layer w6: R13.2@1654,1647 1654.74,1646.26 U6.10@1842.66,1646.26
XO_A#: C34.2 U6.9 X2.3 | length 258.9
  Top Layer w6: C34.2@1591.83,1670.63 1599.2,1678 1668,1678 1680.06,1665.94 U6.9@1842.66,1665.94
XTAL_IN: C14.2 R9.1 X1.1 | length 67
  Bottom Layer w22: R9.1@719,1835 v1(786,1835)
XTAL_OUT: C15.2 U4.44 X1.3 | length 332.1
  Top Layer w6: U4.44@371.26,1786.89 516.11,1786.89 528,1775 662,1775 X1.3@698.39,1775
ZEROA: SB1.2 U8.11 | length 224.3
  Top Layer w10: SB1.2@1814,1455 SB1.2@1814.75,1454.25 ; v1(1882.25,1297.75) 1936.04,1297.75 U8.11@1936.79,1298.5
  Bottom Layer w10: v1(1853,1454) 1882.25,1424.75 v1(1882.25,1297.75)
pads on no net: U1.6 U4.5 U4.6 U4.7 U4.8 U4.10 U4.11 U4.18 U4.21 U4.24 U4.34 U6.5 U6.22 U8.5 U9.13 U10.3 U10.4

## Polygon pours and split planes (outlines as drawn)
GND on Bottom Layer "NONET_L-01_P-001" (hatched 45Degree grid 20 track 10, remove dead copper, pour order 0): 17,2034 17,487 503,487 503,13 2736,13 2736,21 2731,2034
GND on Top Layer "NONET_L-01_P-001" (hatched 45Degree grid 20 track 10, remove dead copper, pour order 1): 17,2034 17,487 503,487 503,13 2736,13 2736,21 2731,2034

## Other copper
Top Layer:
  rectangle net GND: 262,2219 284,2259
  region net GND: 70.61,2282 -48,2282 -48,2163 70.61,2163
  rectangle net GND: 1175.4,2016.6 1267.4,2057.6
  rectangle net GND: 1186,1777 1278,1818
  rectangle net GND: 1834,476 2054,513
  rectangle net GND: 1817,476 1884,591
  rectangle net GND: 111,389 207,461
  rectangle net GND: 524,95 747,138
  rectangle net GND: 2453,-83 2805,88
  rectangle net VCC_3V3: 2514,1570 2598,1693.83
  rectangle net VCC_3V3: 774,33 812,147
  rectangle net GND: 537,-73 806.94,-4
  region net GND: 806.94,25.95 765.94,25.95 765.94,-58.05 806.94,-58.05
  rectangle net GND: 2730,207 2778,293
  rectangle net GND: 2769,-83 2829,293
  rectangle net VCC#: 323.23,1860 337.01,1929
  rectangle net GPIO16: 1170,1875 1250,1914
  rectangle net SDI/SD1: 923,1779 1005,1813
  rectangle net FEED#: 209,2019 306,2206
  rectangle net GND: 743,161 1119,581
  rectangle net NetC46_2: 81,2163 189,2282
  rectangle net GND: 2016,222 2475,259
  rectangle net VCC_12V: 1244,129 1469,517
  rectangle net IO_0: 40,1612 68,1658
  rectangle net OUT1_P: 1605,1869 1645,1914
  rectangle net VDD_SDIO: 941,1630 1035,1667
  rectangle net SCK_DAC: 562,1649 890,1683
  rectangle net VOUTR#: 1873,1393 2002,1499
  rectangle net MUTE: 1796,1380 1865,1416
  rectangle net ZEROA: 1796,1440 1865,1476
  rectangle net NetC60_2: 2117,1339 2183,1499
  rectangle net VOUTL#: 2393,1337 2537,1443
  rectangle net VCC_12V: 1199,129 1469,221
  rectangle net CII#: 1135,97 1173,195
  rectangle net VCC_12V#: 1860,895 1962,934
  rectangle net GND: 1867,966 2019,1015
  rectangle net PLIMIT: 1720,626 1787,667
  rectangle net GND: 1555,728 1595,890
  rectangle net VCC_12V#: 1490,903 1962,934
  rectangle net GND: 1653,638 1693,672
  rectangle net NetL7_1: 1566,487 1635,609
  rectangle net VCC_12V: 1413,487 1553,612
  rectangle net VCC_12V: 1244,497 1492,664
  rectangle net VCC_12V#: 1509,632 1609,718
  rectangle net VCC_3V3: 445,1017 656,1132
  rectangle net VCC_3V3: 238,684 568,1132
  rectangle net GND: 1219,966 1892,1167
  rectangle net GND: 1142,966 1247,1010
  rectangle net GND: 604,539 1198,1010
  region net XTAL_OUT: 744.39,1793.93 679,1793.93 679,1740.93 744.39,1740.93
  rectangle net ENABLE: -13,1656 31,1873
  rectangle net GND: 770,1721 916,1793.93
  rectangle net RX: -62,942 2,1146
  rectangle net GND: -79,443 207,523.5
  rectangle net GND: 1900,1339 2052,1368
  rectangle net NetR26_1: 1905,1144 1970,1182
  rectangle net MUTE: 1788,1208 1844,1257
  rectangle net GND: 1817,572 1912,784
  rectangle net VCC_3V3: 1747,1703 1777,1721
  rectangle net GND: 680,1808 744.39,1939
  rectangle net NetD1_1: 616,1338 947,1456
  rectangle net GND: 2729.36,1605.83 2823,1878
  rectangle net VCC_3V3: 2518,1605.83 2721,1693.83
  rectangle net GND: 1986,910 2044,1015
  rectangle net VCC_5V#: 2256,1142 2360,1245
  rectangle net GND: 2006,194 2054,513
  rectangle net VCC_12V#: 2114,306 2313,437
  rectangle net SPKP: 2292,477 2408,664
  rectangle net GND: 2366,225 2465,438
  rectangle net GND: 2334,980 2448,1036
  rectangle net GND: 2429,225 2480,1036
  rectangle net GND: 401,1912 744.39,1981
  rectangle net CAP1: 455,1851 588,1905
  rectangle net GND: 411,190 508,398
  rectangle net GND: 1723,783 1831,821
  rectangle net VCC_12V#: 1610,834 1661,934
  rectangle net \F\A\U\L\T\: 1671,834 1787,885
  rectangle net VCC_12V#: 1316,692 1537,934
  rectangle net BSN: 2056,771 2090,828
  rectangle net VCC_12V#: 1860,835 2100,895
  rectangle net VCC_12V#: 2060,988 2314,1033
  region net OUTN: 2215,873 2112,873 2112,702 2215,702
  rectangle net SPKN: 2300,707 2408,873
  rectangle net VCC_3V3: 1150,1195 1190,1275
  rectangle net GND: 1257,1079 1447,1155
  rectangle net GND: 1422,1079 1621,1203
  rectangle net GND: 1541,1079 1680,1370
  rectangle net GND: 1671,1128 1840,1193
  rectangle net OUTP: 2092,577 2158,664
  rectangle net OUTP: 2149,482 2214,664
  rectangle net VCC_12V#: 2081,306 2122,534
  rectangle net VCC_12V#: 1911,523 2122,565
  region net VCC_5V: 1510,1446 1388,1446 1388,1251 1510,1251
  rectangle net "IPK SNS": 1240,1349 1362,1446
  rectangle net "IPK SNS": 1033,1400 1362,1444
  rectangle net CII: 1215,1174 1314,1277
  rectangle net GND: 862,1126 1097,1284
  rectangle net NetD1_1: 522,1335 653,1557
  rectangle net GND: -80,1649 -23,1905
  rectangle net GND: 411,-73 556,227
  rectangle net GND: 517,210 776,227
  region net VCC_5V: 599,278 516,278 516,235 599,235
  rectangle net OUT_EN: 641,235 720,278
  rectangle net VCC_5V#: 641,160 720,203
  rectangle net CII#: 1084,97 1173,131
  rectangle net VCC_5V: 903,25 1075,140
  rectangle net NetR5_2: 1088,-46 1176,-26
  rectangle net NetR5_2: 1128,-46 1176,21
  rectangle net "IPK SNS#": 1088,-9 1120,62
  rectangle net "IPK SNS#": 1096,30 1176,62
  rectangle net GND: 1186,100 1329,120
  rectangle net GND: 1260,29 1369,55
  rectangle net NetD2_2: 1397,-52 1859,76
  rectangle net DTR: 46,1721 94,1739
  region net NetC33_2: 1471.03,1633 1344,1633 1344,1569 1471.03,1569
  rectangle net XO_A#: 1492,1650.93 1607,1699.93
  region net GND: 1471.03,1699.93 1344,1699.93 1344,1650.93 1471.03,1650.93
  rectangle net GND: 1492,1584 1607,1633
  rectangle net VCC_3V3: 1752,1561 1873,1593
  region net GND: 744.39,1858 647,1858 647,1805 744.39,1805
  rectangle net XTAL_IN: 773,1805 870,1858
  rectangle net ENABLE: -13,1670 78,1688
  rectangle net VCC_3V3: 362.57,1860 428,1900
  rectangle net NetJ1_1: 22,1956 312,1993
  rectangle net GND: -80,1895 10,2055
  pour cut-out: 1792,1476 1792,1376 1836,1376 1836,1476
  pour cut-out: 268,2062 268,1953 370.79,1953 370.79,2062
  pour cut-out: 558,1747 558,1647 665,1647 665,1747
  pour cut-out: 31,1656 29,1654 29,1543 131,1543 133,1543 133,1653 34,1653
  pour cut-out: 328,1580 328,1579 328,1015 834,1015 835,1016 835,1586 332,1586 328,1586
  pour cut-out: 2156,892.48 2156,686.5 2363.5,686.5 2363.5,893.53
  pour cut-out: 2159.5,677.47 2159.5,476.5 2363.5,476.5 2363.5,678.49
  pour cut-out: 1506,457 1507,456 1507,-68 2008,-68 2008,457 1507,457
Bottom Layer:
  rectangle net GND: -40,-78 118,181
  rectangle net GND: -83,-78 -10,502
  rectangle net VCC_3V3: 19,206 55,274
  rectangle net VCC_5V#: 2223,11 2320,79
  rectangle net NetP1_1: 2690,1097 2808,1159
  rectangle net NetP2_1: 2694,872 2808,934
  rectangle net NetP3_1: 2694,652 2808,714
  rectangle net GPIO16: 1169,1890 1219,1938
  rectangle net GND: 219,1616 258,1632
  rectangle net SDA: 2067,1662 2129,1697
  rectangle net SCL: 2136,1691 2189,1725
  rectangle net VCC_3V3: 2121,1733 2178,1784
  rectangle net VCC_3V3: 2069,1707 2128,1784
  rectangle net AVCC: 1593,587 1654,665
  rectangle net NetR30_1: 1578,470 1660,553
  rectangle net VCC_12V#: 1429,652 1571,742
  rectangle net AVCC: 1593,652 1716,724
  region net LRCK_DAC: 2076.25,1238.25 2019,1238.25 2019,1195 2076.25,1195
  region net BCK_DAC: 2076.25,1129.25 2021,1129.25 2021,1091.25 2076.25,1091.25
  rectangle net DATA_DAC: 2046,1143 2094,1181
  rectangle net NetR26_1: 1895,1143 1950,1183
  rectangle net GND: 1874,1661 1949,1700
  rectangle net GND: 219,1629 304,1844
  rectangle net VCC_3V3: 350,1790 416,1938
  rectangle net VCC_3V3: 358,1624 400,1644
  rectangle net VCC_3V3: 326,1624 373,1887
  rectangle net GND: 1341,1538 1723,1683
  rectangle net GND: 1684,1538 1946,1582
  rectangle net GND: 1684,1651 1949,1683
  rectangle net NetC32_2: 1826,1602 1918,1642
  rectangle net GAIN0: 1794,749 1835,799
  rectangle net GND: 1741,680 1868,726
  rectangle net GND: 1914,1298 2033,1338
  rectangle net VCC_3V3: 160,1662 200,1804
  rectangle net VCC#: 266,1898 341,1938

## Silkscreen, mask and mechanical layers (free items; w line width, h text height)
Top Overlay:
  lines w7: 689.5,102.5 702.5,115.5 ; 694.5,115.5 702.5,115.5 ; 702.5,107.5 702.5,115.5
  lines w10: -9,2168 6,2183 24,2183 ; 1399,842 1399,816 1461,754 1500,754 ; 1443,837 1443,826 1460,809 1500,809 ; 2121,489 2140,489 2147,482 2147,348 2137,338 ; 2281,1132 2307.75,1132 2316.38,1140.62
  text "GND" at 21,1468 h60
  text "DTR" at 19,1377 h60
  text "RTS" at 19,1277 h60
  text "DEMP" at 2566,1198 h60
  text "TX" at 19,1177 h60
  text "NetP1_1" at 2516,1093 h60
  text "RX" at 19,1077 h60
  text "FMT" at 2564,974 h60
  text "RX" at 19,937 h60
  text "NetP2_1" at 2516,868 h60
  text "TX" at 19,837 h60
  text "MUTE" at 2566,753 h60
  text "IO_0" at 19,737 h60
  text "NetP3_1" at 2516,648 h60
  text "IO_2" at 19,637 h60
  text "EN" at 19,537 h60
  text "SPKN" at 2566,528 h60
  text "GND" at 19,437 h60
  text "SPKP" at 2566,428 h60
  text "5V" at 2122,2 h60 r90
  text "12V" at 2222,2 h60 r90
  text "5V#" at 2322,2 h60 r90
  text "3V3" at 2422,2 h60 r90
  text "GND" at 2522,2 h60 r90
  text "DC JACK" at 405,-85 h60
Bottom Overlay:
  drawing of 3082 lines, arcs and shapes, not listed
  text "ZERO CARBON FOOTPRINT" at 1318,1091 h30
Board Oultine:
  the board outline again, w10

## Dimensions
-90,2300 to 2835,2300 on Dimension
-90,-85 to -90,2300 on Dimension